# Altium PCB MONO65_A2.PcbDoc (part 1 of 4)
Units mm, origin at the board's own origin, x right, y up, seen from the top; angles counter-clockwise.
Board outline 304.6 x 95.05 mm, 2 copper layers (Component Side, Solder Side), stack 1.586 mm thick; 275 components, 185 nets, 1029 pads, 156 vias.
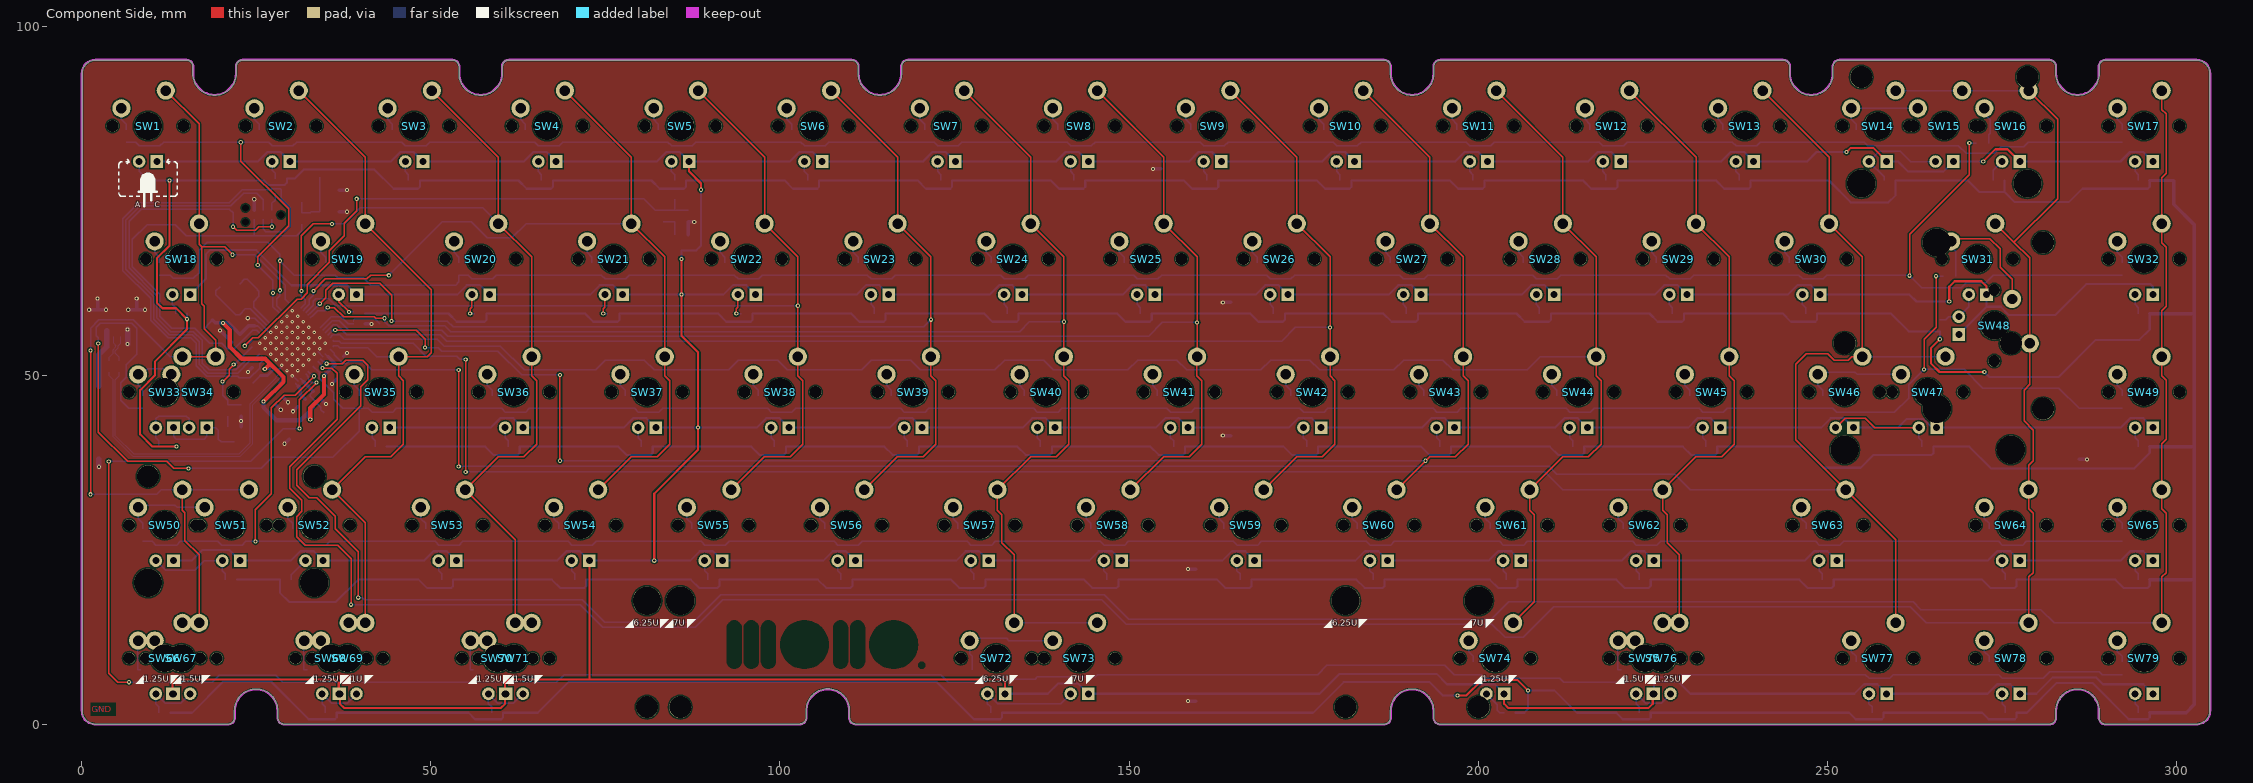
[diagram p0: Component Side view]
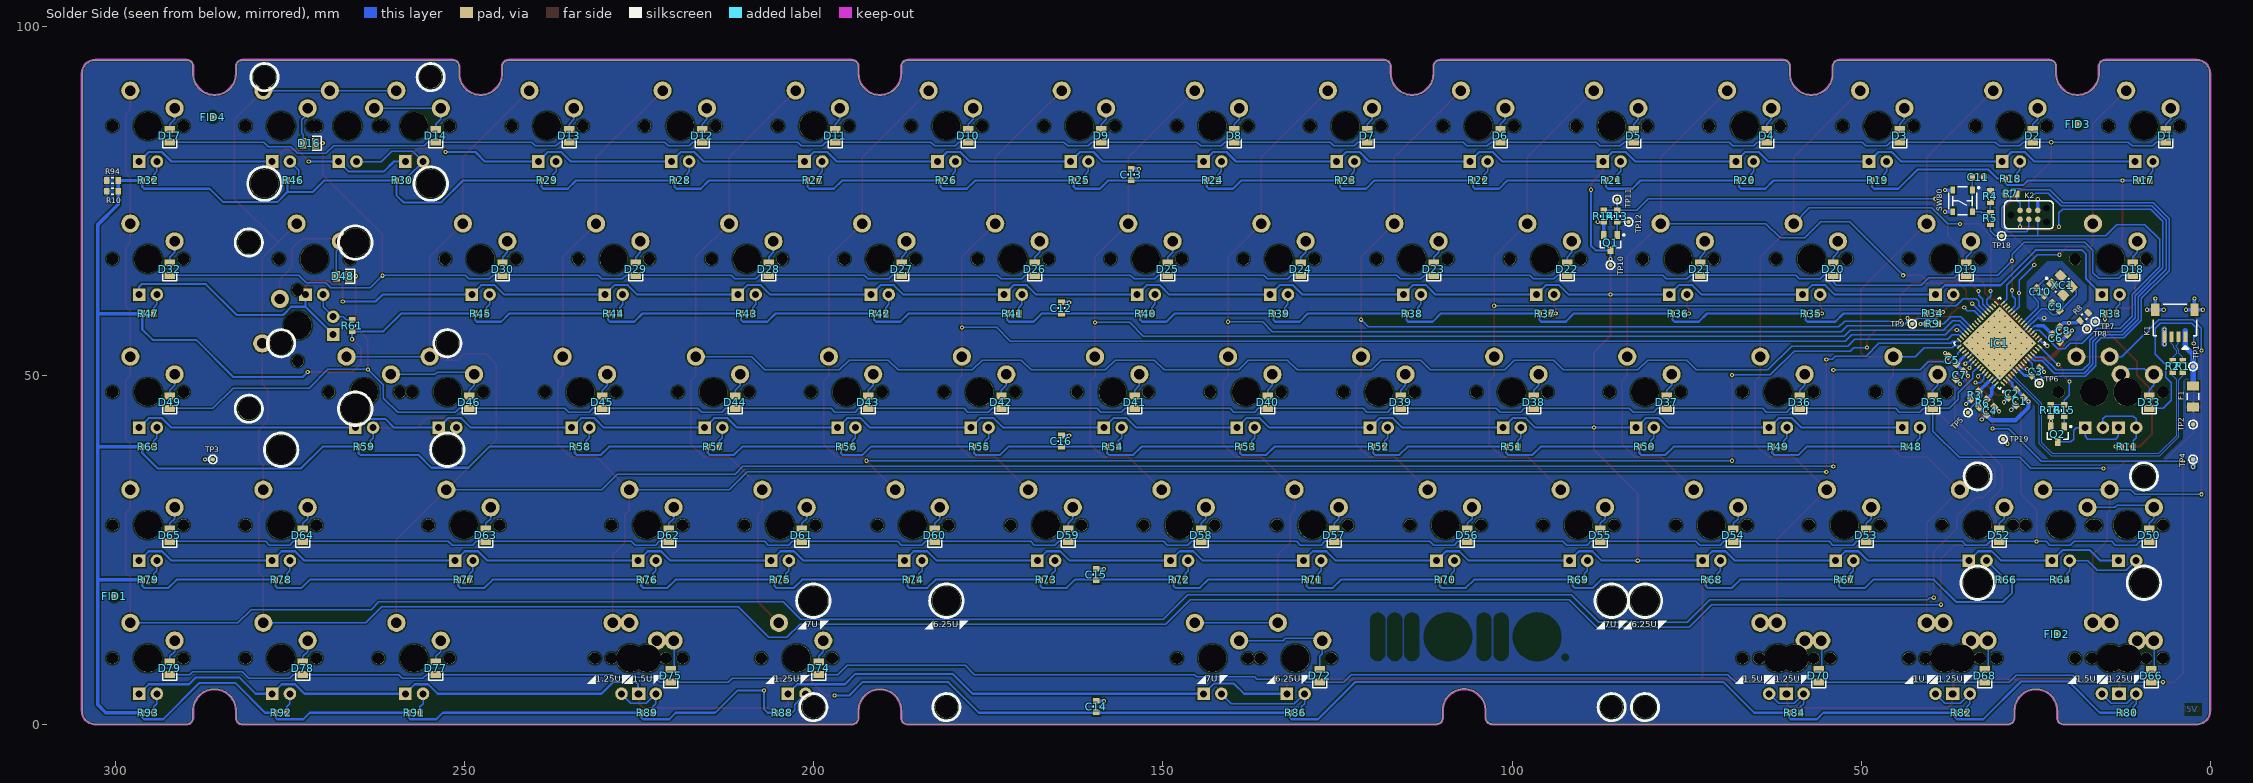
[diagram p1: Solder Side view, seen from below]
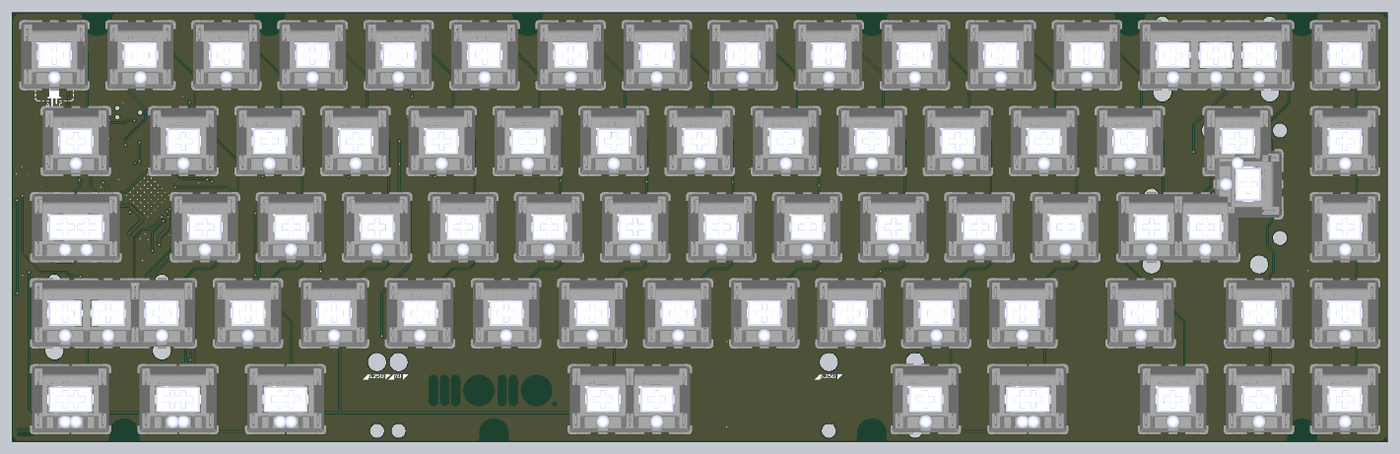
[diagram p4: 3D render of the assembled board from above, using the file's embedded part models]
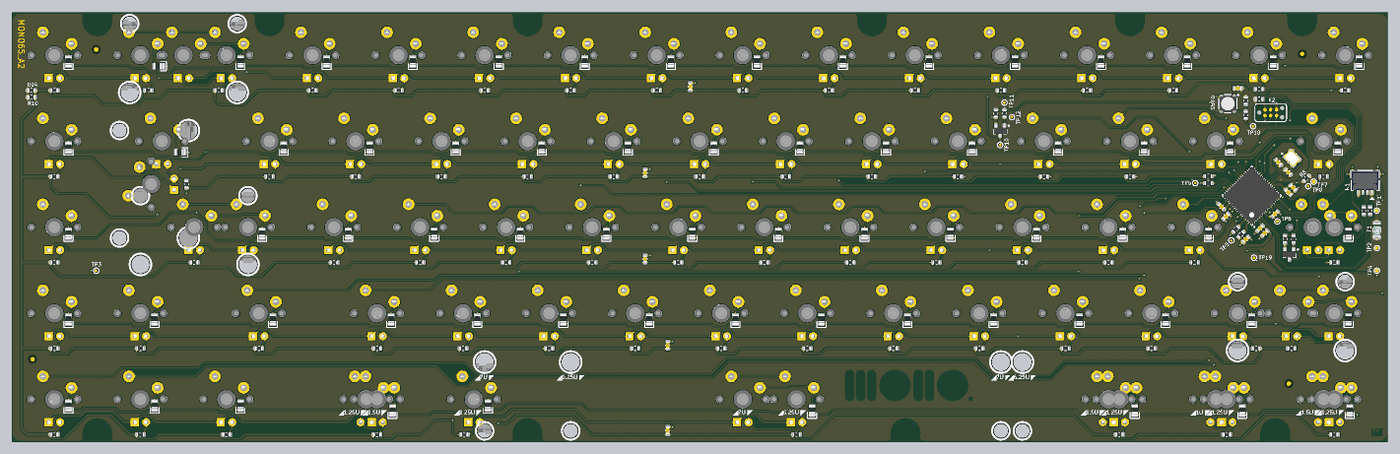
[diagram p5: 3D render of the assembled board from below, using the file's embedded part models]

## Layer stack, top to bottom
Top Solder: solder mask 0.0102, Solder Resist, Dk 3.5
Component Side: signal copper 0.018
Dielectric 1: core 1.55, Core-009, Dk 4.5
Solder Side: signal copper 0.018
Bottom Solder: solder mask 0.0102, Solder Resist, Dk 3.5

## Board outline
2,0.1 21.003,0.1 ccw(c21.003,1) 21.903,1 21.903,2.025 cw(c22.003,2.025) 21.903,2.026 cw(c25.003,2.025) 28.103,2.025 28.103,1 ccw(c29.003,1) 29.003,0.1 94.565,0.115 cw(c94.565,0.015) 94.565,0.115 102.851,0.115 cw(c102.851,0.015) 102.852,0.115 ccw(c102.851,1.015) 103.751,1.015 103.751,2.04 cw(c103.851,2.04) 103.751,2.041 cw(c106.851,2.04) 109.951,2.04 109.951,1.016 cw(c110.877,1.026) 109.951,1.016 ccw(c110.877,1.026) 110.852,0.1 ccw(c110.877,1.026) 110.854,0.1 110.851,0.1 186.5,0.1 ccw(c186.5,1) 187.4,1 187.4,2.025 cw(c187.5,2.025) 187.4,2.026 ccw(c190.5,2.025) 187.4,2.025 187.4,2.026 cw(c190.5,2.025) 193.6,2.025 193.6,1 ccw(c194.5,1) 194.5,0.1 281.75,0.101 cw(c281.75,0.001) 281.751,0.101 ccw(c281.751,1) 282.65,1 ccw(c281.751,1) 282.65,1 ccw(c281.751,1) 282.65,1.001 cw(c282.75,1.001) 282.65,1.001 282.65,2.026 cw(c282.75,2.026) 282.65,2.027 ccw(c285.75,2.025) 282.65,2.026 282.65,2.027 cw(c285.75,2.025) 288.85,2.026 cw(c288.75,2.026) 288.85,2.026 288.85,1.001 cw(c288.75,1.001) 288.85,1 cw(c289.749,1) 288.85,1.001 ccw(c288.75,1.001) 288.85,1.001 288.85,1 ccw(c289.749,1) 289.749,0.101 cw(c289.75,0.001) 289.75,0.101 292.125,0.1 302.8,0.1 ccw(c302.799,2.001) 304.7,2 304.7,93.25 ccw(c302.799,93.249) 302.8,95.15 292.125,95.149 cw(c292.125,95.249) 292.125,95.149 289.75,95.149 cw(c289.75,95.249) 289.75,95.149 ccw(c289.749,94.25) 288.85,94.25 ccw(c289.749,94.25) 288.85,94.249 288.85,93.224 cw(c288.75,93.224) 288.85,93.224 cw(c285.75,93.225) 282.65,93.223 cw(c282.75,93.224) 282.65,93.224 282.65,94.249 cw(c282.75,94.249) 282.65,94.25 ccw(c281.75,94.25) 281.751,95.15 cw(c281.75,95.25) 281.75,95.15 251.65,95.149 ccw(c251.65,95.249) 251.65,95.149 cw(c251.65,95.249) 251.65,95.149 ccw(c251.649,94.25) 250.75,94.25 ccw(c251.649,94.25) 250.75,94.249 ccw(c250.65,94.249) 250.75,94.25 250.75,94.249 250.75,93.224 cw(c250.65,93.224) 250.75,93.223 ccw(c247.65,93.225) 250.75,93.224 ccw(c250.65,93.224) 250.75,93.224 250.75,93.223 cw(c247.65,93.225) 244.55,93.224 cw(c244.65,93.224) 244.55,93.224 244.55,94.249 cw(c244.65,94.249) 244.55,94.249 ccw(c243.65,94.25) 244.55,94.25 ccw(c243.65,94.25) 243.65,95.15 cw(c243.649,95.25) 243.649,95.15 194.5,95.149 cw(c194.5,95.249) 194.5,95.149 ccw(c194.499,94.25) 193.6,94.25 cw(c193.5,94.249) 193.6,94.249 193.6,93.224 cw(c193.5,93.224) 193.6,93.224 cw(c190.5,93.225) 187.4,93.223 cw(c187.5,93.224) 187.4,93.224 187.4,94.249 cw(c187.5,94.249) 187.4,94.25 ccw(c186.5,94.25) 186.501,95.15 cw(c186.5,95.25) 186.5,95.15 118.3,95.149 cw(c118.3,95.249) 118.3,95.149 ccw(c118.299,94.25) 117.4,94.25 ccw(c118.299,94.25) 117.4,94.249 ccw(c117.3,94.249) 117.4,94.25 117.4,94.249 117.4,93.224 cw(c117.3,93.224) 117.4,93.224 cw(c114.3,93.225) 111.2,93.223 cw(c114.3,93.225) 111.2,93.224 cw(c111.3,93.224) 111.2,93.224 111.2,94.249 cw(c111.3,94.249) 111.2,94.25 ccw(c110.3,94.25) 110.3,95.15 cw(c110.299,95.25) 110.299,95.15 88.25,95.149 cw(c88.25,95.249) 88.25,95.149 61.15,95.149 cw(c61.15,95.249) 61.15,95.149 ccw(c61.149,94.25) 60.25,94.25 cw(c60.15,94.249) 60.25,94.249 60.25,93.224 cw(c60.15,93.224) 60.25,93.223 cw(c57.15,93.225) 54.05,93.224 cw(c54.15,93.224) 54.05,93.224 54.05,94.249 cw(c54.15,94.249) 54.05,94.249 ccw(c53.15,94.25) 54.05,94.25 ccw(c53.15,94.25) 53.15,95.15 23.05,95.149 cw(c23.05,95.249) 23.05,95.149 ccw(c23.049,94.25) 22.15,94.25 cw(c22.05,94.249) 22.15,94.249 22.15,93.224 cw(c22.05,93.224) 22.15,93.223 ccw(c19.05,93.225) 22.15,93.224 ccw(c22.05,93.224) 22.15,93.224 22.15,93.223 cw(c19.05,93.225) 15.95,93.224 cw(c16.05,93.224) 15.95,93.224 15.95,94.249 cw(c16.05,94.249) 15.95,94.25 ccw(c15.051,94.25) 15.95,94.25 ccw(c15.051,94.25) 15.05,95.149 cw(c15.05,95.249) 15.05,95.149 12.675,95.15 2,95.15 ccw(c2.001,93.249) 0.1,93.251 cw(c0,93.25) 0.1,93.25 0.1,2 cw(c0,2) 0.1,1.999 ccw(c2.001,2.001)

## Design rules (kind name [scope] priority, off if disabled: settings)
Clearance Clearance_FIDs [(InComponent('FID1') OR InComponent('FID2') OR InComponent('FID3') OR InComponent('FID4')) vs (InPolygon AND OnLayer('Component Side') OR OnLayer('Solder Side'))] p1: gap=0.5 ignorepadtopadclearanceinfootprint=FALSE
Clearance Clearance_USB-5V_SYS [InNetClass('USB') vs InNamedPolygon('5V_SYS_L02_P008')] p2: gap=0.5 ignorepadtopadclearanceinfootprint=TRUE
Clearance [All] p3: gap=0.2 ignorepadtopadclearanceinfootprint=TRUE
ComponentClearance [All] p1 off: gap=0.254 collisioncheckmode=3 verticalgap=0.254 showdistances=FALSE
DiffPairsRouting DiffPair_90_USB_DiffPairsRouting [InDifferentialPairClass('DIFF_90Ohm_USB')] p1: maxlimit=0.2 minlimit=0.2 mostfreqgap=0.2 toplayer_minwidth=0.135 toplayer_maxwidth=0.135 toplayer_prefwidth=0.135 bottomlayer_minwidth=0.135 bottomlayer_maxwidth=0.135 bottomlayer_prefwidth=0.135 maxuncoupledlength=12.7
DiffPairsRouting [All] p2: maxlimit=0.254 minlimit=0.254 mostfreqgap=0.254 toplayer_minwidth=0.381 toplayer_maxwidth=0.381 toplayer_prefwidth=0.381 bottomlayer_minwidth=0.381 bottomlayer_maxwidth=0.381 bottomlayer_prefwidth=0.381 maxuncoupledlength=12.7
Height [All] p1 off: minheight=0 maxheight=25.4 prefheight=12.7
HoleSize [All] p1: absolutevalues=TRUE maxlimit=5 minlimit=0.15 maxpercent=80.000 minpercent=20.000
MatchedLengths DiffPair_100_HDMI_MatchedLengths [InDifferentialPairClass('DIFF_100Ohm_HDMI')] p1: tolerance=0.15 checknetsindiffpair=TRUE checkdiffpairvsdiffpair=FALSE checkxsignals=FALSE checkothers=FALSE
MatchedLengths DiffPair_100_ETH_MatchedLengths [InDifferentialPairClass('DIFF_100Ohm_ETHERNET')] p2: tolerance=0.15 checknetsindiffpair=TRUE checkdiffpairvsdiffpair=FALSE checkxsignals=FALSE checkothers=FALSE
MatchedLengths DiffPair_100_DSI_MatchedLengths [InDifferentialPairClass('DIFF_100Ohm_DSI')] p3: tolerance=0.15 checknetsindiffpair=TRUE checkdiffpairvsdiffpair=FALSE checkxsignals=FALSE checkothers=FALSE
MatchedLengths DiffPair_90_USB_MatchedLengths [InDifferentialPairClass('DIFF_90Ohm_USB')] p4: tolerance=0.15 checknetsindiffpair=TRUE checkdiffpairvsdiffpair=FALSE checkxsignals=FALSE checkothers=FALSE
MinimumSolderMaskSliver [All] p1: minsoldermaskwidth=0.127
PlaneClearance [All] p1: clearance=0.5
PlaneConnect PlaneConnect_Via [IsVia] p1: planeconnectstyle=Direct reliefexpansion=0.508 reliefentries=4 reliefconductorwidth=0.254 reliefairgap=0.254
PlaneConnect [All] p2: pad.planeconnectstyle=Relief pad.reliefexpansion=0.5 pad.reliefentries=4 pad.reliefconductorwidth=0.75 pad.reliefairgap=0.15 via.planeconnectstyle=Direct via.reliefexpansion=0.5 via.reliefentries=4 via.reliefconductorwidth=0.75 via.reliefairgap=0.25
PolygonConnect PolygonConnect_Any_net_TOP_LAYER [InNetClass('All Nets') vs OnLayer('Component Side')] p1: thpad.connectstyle=Relief thpad.reliefconductorwidth=1 thpad.reliefentries=4 thpad.polygonreliefangle="90 Angle" thpad.airgapwidth=0.15 smdpad.connectstyle=Relief smdpad.reliefconductorwidth=0.5 smdpad.reliefentries=4 smdpad.polygonreliefangle="90 Angle" smdpad.airgapwidth=0.15 via.connectstyle=Direct via.reliefconductorwidth=1 via.reliefentries=4 via.polygonreliefangle="90 Angle" via.airgapwidth=0.15
PolygonConnect PolygonConnect_Any_net_All_layers [InNetClass('All Nets')] p2: thpad.connectstyle=Relief thpad.reliefconductorwidth=1 thpad.reliefentries=4 thpad.polygonreliefangle="90 Angle" thpad.airgapwidth=0.15 smdpad.connectstyle=Relief smdpad.reliefconductorwidth=0.5 smdpad.reliefentries=4 smdpad.polygonreliefangle="90 Angle" smdpad.airgapwidth=0.15 via.connectstyle=Direct via.reliefconductorwidth=1 via.reliefentries=4 via.polygonreliefangle="90 Angle" via.airgapwidth=0.15
PolygonConnect PolygonConnect_GND [InNet('GND')] p3: thpad.connectstyle=Relief thpad.reliefconductorwidth=1 thpad.reliefentries=4 thpad.polygonreliefangle="90 Angle" thpad.airgapwidth=0.15 smdpad.connectstyle=Relief smdpad.reliefconductorwidth=1 smdpad.reliefentries=4 smdpad.polygonreliefangle="90 Angle" smdpad.airgapwidth=0.15 via.connectstyle=Direct via.reliefconductorwidth=1 via.reliefentries=4 via.polygonreliefangle="90 Angle" via.airgapwidth=0.15
RoutingVias [All] p1: holewidth=0.3 width=0.6 viastyle="Through Hole" minholewidth=0.2 minwidth=0.5 maxholewidth=0.3 maxwidth=0.6
SolderMaskExpansion [All] p1: expansion=0.102
UnRoutedNet [All] p1: checkbadconnections=TRUE
Width [All] p1: maxlimit=20 minlimit=0.15 preferedwidth=0.5
22 further rules are at their usual default settings.

## Classes and differential pairs
component class "MONO65_A2_s06 [LEDs]": C12 C13 C14 C15 C16 Q1 Q2 R10 R11 R13 R14 R15 R16 R17 R18 R19 R20 R21 R22 R23 R24 R25 R26 R27 R28 R29 R30 R32 R33 R34 R35 R36 R37 R38 R39 R40 R41 R42 R43 R44 R45 R46 R47 R48 R49 R50 R51 R52 R53 R54 R55 R56 R57 R58 R59 R61 R63 R64 R66 R67 R68 R69 R70 R71 R72 R73 R74 R75 R76 R77 R78 R79 R80 R82 R84 R86 R88 R89 R91 R92 R93 R94 TP10 TP11 TP12
differential pair class DIFF_90Ohm_USB: MCU_USB USB
net class USB: MCU_USB_N MCU_USB_P USB_N USB_P
component class "MONO65_A2_s07 [PSU]": F1 FID1 FID2 FID3 FID4 K1 R1 R2 TP1 TP2 TP3 TP4
component class "MONO65_A2_s03 [MCU]": C1 C2 C3 C4 C5 C6 C7 C8 C9 C10 C11 IC1 K2 R3 R4 R5 R6 R7 R8 R9 SW80 TP5 TP6 TP7 TP8 TP9 TP18 TP19 XC1
component class "MONO65_A2_s04 [Switches-1]": D1 D2 D3 D4 D5 D6 D7 D8 D9 D10 D11 D12 D13 D14 D16 D17 D18 D19 D20 D21 D22 D23 D24 D25 D26 D27 D28 D29 D30 D32 D33 D35 D36 D37 D38 D39 D40 D41 D42 D43 D44 D45 D46 D48 D49 D50 D52 D53 D54 D55 D56 D57 D58 D59 D60 D61 D62 D63 D64 D65 D66 D68 D70 D72 D74 D75 D77 D78 D79 SW1 SW2 SW3 SW4 SW5 SW6 SW7 SW8 SW9 SW10 SW11 SW12 SW13 SW14 SW15 SW16 SW17 SW18 SW19 SW20 SW21 SW22 SW23 SW24 SW25 SW26 SW27 SW28 SW29 SW30 SW31 SW32 SW33 SW34 SW35 SW36 SW37 SW38 SW39 SW40 SW41 SW42 SW43 SW44 SW45 SW46 SW47 SW48 SW49 SW50 SW51 SW52 SW53 SW54 SW55 SW56 SW57 SW58 SW59 SW60 SW61 SW62 SW63 SW64 SW65 SW66 SW67 SW68 SW69 SW70 SW71 SW72 SW73 SW74 SW75 SW76 SW77 SW78 SW79
differential pair USB: +USB_P -USB_N
differential pair MCU_USB: +MCU_USB_P -MCU_USB_N

## Components (designator, comment, footprint, x,y, rotation, side; value= is the part's Value field where it differs from the comment)
C1 "10u 16V" CAPC1608X08N 27.3,46.325 r315 bottom
C2 "100n 50V" CAPC1608X08N 28.35,47.4 r315 bottom
C3 "1u 25V" CAPC1608X08N 25.05,50.575 r135 bottom
C4 "100n 50V" CAPC1608X08N 31.525,44.95 r135 bottom
C5 "100n 50V" CAPC1608X08N 36.95,52.2 r45 bottom
C6 "100n 50V" CAPC1608X08N 22.125,55.344 r225 bottom
C7 "10u 16V" CAPC1608X08N 35.925,50.025 r315 bottom
C8 "10u 16V" CAPC1608X08N 21.05,56.4 r225 bottom
C9 "22p 50V" CAPC1608X08N 22.145,59.818 r45 bottom
C10 "22p 50V" CAPC1608X08N 24.34,62.018 r225 bottom
C11 "100n 50V" CAPC1608X08N 33.285,78.4 r0 bottom
C12 "10u 16V" CAPC1608X08N 164.5,59.666 r90 bottom
C13 "10u 16V" CAPC1608X08N 154.5,78.781 r90 bottom
C14 "10u 16V" CAPC1608X08N 159.5,2.6 r90 bottom
C15 "10u 16V" CAPC1608X08N 159.5,21.5 r90 bottom
C16 "10u 16V" CAPC1608X08N 164.5,40.6 r90 bottom
D1 "SD0805S040S0R5" "DIOC2012X06N - signal" 6.4,84.3 r90 bottom
D2 "SD0805S040S0R5" "DIOC2012X06N - signal" 25.45,84.3 r90 bottom
D3 "SD0805S040S0R5" "DIOC2012X06N - signal" 44.5,84.3 r90 bottom
D4 "SD0805S040S0R5" "DIOC2012X06N - signal" 63.55,84.3 r90 bottom
D5 "SD0805S040S0R5" "DIOC2012X06N - signal" 82.6,84.3 r90 bottom
D6 "SD0805S040S0R5" "DIOC2012X06N - signal" 101.65,84.3 r90 bottom
D7 "SD0805S040S0R5" "DIOC2012X06N - signal" 120.7,84.3 r90 bottom
D8 "SD0805S040S0R5" "DIOC2012X06N - signal" 139.75,84.3 r90 bottom
D9 "SD0805S040S0R5" "DIOC2012X06N - signal" 158.8,84.3 r90 bottom
D10 "SD0805S040S0R5" "DIOC2012X06N - signal" 177.85,84.3 r90 bottom
D11 "SD0805S040S0R5" "DIOC2012X06N - signal" 196.9,84.3 r90 bottom
D12 "SD0805S040S0R5" "DIOC2012X06N - signal" 215.95,84.3 r90 bottom
D13 "SD0805S040S0R5" "DIOC2012X06N - signal" 235,84.3 r90 bottom
D14 "SD0805S040S0R5" "DIOC2012X06N - signal" 254.05,84.3 r90 bottom
D16 "SD0805S040S0R5" "DIOC2012X06N - signal" 272.173,83.275 r0 bottom
D17 "SD0805S040S0R5" "DIOC2012X06N - signal" 292.15,84.3 r90 bottom
D18 "SD0805S040S0R5" "DIOC2012X06N - signal" 11.162,65.25 r90 bottom
D19 "SD0805S040S0R5" "DIOC2012X06N - signal" 34.975,65.25 r90 bottom
D20 "SD0805S040S0R5" "DIOC2012X06N - signal" 54.025,65.25 r90 bottom
D21 "SD0805S040S0R5" "DIOC2012X06N - signal" 73.075,65.25 r90 bottom
D22 "SD0805S040S0R5" "DIOC2012X06N - signal" 92.125,65.25 r90 bottom
D23 "SD0805S040S0R5" "DIOC2012X06N - signal" 111.175,65.25 r90 bottom
D24 "SD0805S040S0R5" "DIOC2012X06N - signal" 130.225,65.25 r90 bottom
D25 "SD0805S040S0R5" "DIOC2012X06N - signal" 149.275,65.25 r90 bottom
D26 "SD0805S040S0R5" "DIOC2012X06N - signal" 168.325,65.25 r90 bottom
D27 "SD0805S040S0R5" "DIOC2012X06N - signal" 187.375,65.25 r90 bottom
D28 "SD0805S040S0R5" "DIOC2012X06N - signal" 206.425,65.25 r90 bottom
D29 "SD0805S040S0R5" "DIOC2012X06N - signal" 225.475,65.25 r90 bottom
D30 "SD0805S040S0R5" "DIOC2012X06N - signal" 244.525,65.25 r90 bottom
D32 "SD0805S040S0R5" "DIOC2012X06N - signal" 292.15,65.25 r90 bottom
D33 "SD0805S040S0R5" "DIOC2012X06N - signal" 8.782,46.2 r90 bottom
D35 "SD0805S040S0R5" "DIOC2012X06N - signal" 39.738,46.2 r90 bottom
D36 "SD0805S040S0R5" "DIOC2012X06N - signal" 58.788,46.2 r90 bottom
D37 "SD0805S040S0R5" "DIOC2012X06N - signal" 77.838,46.2 r90 bottom
D38 "SD0805S040S0R5" "DIOC2012X06N - signal" 96.888,46.2 r90 bottom
D39 "SD0805S040S0R5" "DIOC2012X06N - signal" 115.938,46.2 r90 bottom
D40 "SD0805S040S0R5" "DIOC2012X06N - signal" 134.988,46.2 r90 bottom
D41 "SD0805S040S0R5" "DIOC2012X06N - signal" 154.038,46.2 r90 bottom
D42 "SD0805S040S0R5" "DIOC2012X06N - signal" 173.088,46.2 r90 bottom
D43 "SD0805S040S0R5" "DIOC2012X06N - signal" 192.138,46.2 r90 bottom
D44 "SD0805S040S0R5" "DIOC2012X06N - signal" 211.188,46.2 r90 bottom
D45 "SD0805S040S0R5" "DIOC2012X06N - signal" 230.238,46.2 r90 bottom
D46 "SD0805S040S0R5" "DIOC2012X06N - signal" 249.288,46.2 r90 bottom
D48 "SD0805S040S0R5" "DIOC2012X06N - signal" 267.411,64.225 r0 bottom
D49 "SD0805S040S0R5" "DIOC2012X06N - signal" 292.15,46.2 r90 bottom
D50 "SD0805S040S0R5" "DIOC2012X06N - signal" 8.782,27.15 r90 bottom
D52 "SD0805S040S0R5" "DIOC2012X06N - signal" 30.213,27.15 r90 bottom
D53 "SD0805S040S0R5" "DIOC2012X06N - signal" 49.263,27.15 r90 bottom
D54 "SD0805S040S0R5" "DIOC2012X06N - signal" 68.313,27.15 r90 bottom
D55 "SD0805S040S0R5" "DIOC2012X06N - signal" 87.363,27.15 r90 bottom
D56 "SD0805S040S0R5" "DIOC2012X06N - signal" 106.413,27.15 r90 bottom
D57 "SD0805S040S0R5" "DIOC2012X06N - signal" 125.463,27.15 r90 bottom
D58 "SD0805S040S0R5" "DIOC2012X06N - signal" 144.513,27.15 r90 bottom
D59 "SD0805S040S0R5" "DIOC2012X06N - signal" 163.563,27.15 r90 bottom
D60 "SD0805S040S0R5" "DIOC2012X06N - signal" 182.613,27.15 r90 bottom
D61 "SD0805S040S0R5" "DIOC2012X06N - signal" 201.663,27.15 r90 bottom
D62 "SD0805S040S0R5" "DIOC2012X06N - signal" 220.713,27.15 r90 bottom
D63 "SD0805S040S0R5" "DIOC2012X06N - signal" 246.907,27.15 r90 bottom
D64 "SD0805S040S0R5" "DIOC2012X06N - signal" 273.101,27.15 r90 bottom
D65 "SD0805S040S0R5" "DIOC2012X06N - signal" 292.15,27.15 r90 bottom
D66 "SD0805S040S0R5" "DIOC2012X06N - signal" 8.482,7 r90 bottom
D68 "SD0805S040S0R5" "DIOC2012X06N - signal" 32.294,7 r90 bottom
D70 "SD0805S040S0R5" "DIOC2012X06N - signal" 56.106,7 r90 bottom
D72 "SD0805S040S0R5" "DIOC2012X06N - signal" 127.544,7 r90 bottom
D74 "SD0805S040S0R5" "DIOC2012X06N - signal" 199.282,8.1 r90 bottom
D75 "SD0805S040S0R5" "DIOC2012X06N - signal" 220.413,7 r90 bottom
D77 "SD0805S040S0R5" "DIOC2012X06N - signal" 254.051,8.1 r90 bottom
D78 "SD0805S040S0R5" "DIOC2012X06N - signal" 273.1,8.1 r90 bottom
D79 "SD0805S040S0R5" "DIOC2012X06N - signal" 292.15,8.1 r90 bottom
Designator8 "Comment" "TITLE BLOCK A3" -43.299,-105.328 r0 top locked
F1 "0.5A 15VDC PTC" PTC3116X06N 2.5,47 r270 bottom
FID1 "FIDUCIAL 1MM" "FID 1mm" 300.1,18.4 r90 bottom
FID2 "FIDUCIAL 1MM" "FID 1mm" 22,13 r90 bottom
FID3 "FIDUCIAL 1MM" "FID 1mm" 19,86 r90 bottom
FID4 "FIDUCIAL 1MM" "FID 1mm" 286,87 r90 bottom
IC1 "AT90USB1286-MU" QFN50P900X900X100_HS-65N 30.2,54.61 r45 bottom
K1 "SM04B-SRSS-TB" SM04B-SRSS-TB 5.1,58 r0 bottom locked
K2 "TC2030-ICESPI-NL" TC2030-6pin-NL 26,73 r180 bottom
Q1 "FDV303N" SOT95P235X110-3N 85.9,69.025 r270 bottom
Q2 "FDV303N" SOT95P235X110-3N 21.9,41.6 r270 bottom
R1 "22R 1%" RESC1608X04N 4,51.3 r270 bottom
R2 "22R 1%" RESC1608X04N 5.4,51.3 r270 bottom
R3 "0R 1%" RESC1608X04N 33.758,47.163 r315 bottom
R4 "10k 1%" RESC1608X04N 31.5,75.645 r270 bottom
R5 "0R 1%" RESC1608X04N 31.5,72.5 r270 bottom
R6 "0R 1%" RESC1608X04N 32.6,46.025 r315 bottom
R7 "0R 1%" RESC1608X04N 28.575,76 r180 bottom
R8 "0R 1%" RESC1608X04N 18.087,58.42 r315 bottom
R9 "10k 1%" RESC1608X04N 39.8,57.4 r180 bottom
R10 "0R 1%" RESC1608X04N 300.355,76.4 r180 bottom
R11 "470R 1%" RESC1608X04N 11.907,39.825 r180 bottom
R13 "470R 1%" RESC1608X04N 84.95,72.825 r270 bottom
R14 "10k 1%" RESC1608X04N 86.85,72.825 r270 bottom
R15 "470R 1%" RESC1608X04N 20.95,45 r270 bottom
R16 "10k 1%" RESC1608X04N 22.85,45 r270 bottom
R17 "470R 1%" RESC1608X04N 9.525,77.925 r180 bottom
R18 "470R 1%" RESC1608X04N 28.575,78.2 r180 bottom
R19 "470R 1%" RESC1608X04N 47.625,77.925 r180 bottom
R20 "470R 1%" RESC1608X04N 66.675,77.925 r180 bottom
R21 "470R 1%" RESC1608X04N 85.725,77.925 r180 bottom
R22 "470R 1%" RESC1608X04N 104.775,77.925 r180 bottom
R23 "470R 1%" RESC1608X04N 123.825,77.925 r180 bottom
R24 "470R 1%" RESC1608X04N 142.875,77.925 r180 bottom
R25 "470R 1%" RESC1608X04N 161.925,77.925 r180 bottom
R26 "470R 1%" RESC1608X04N 180.975,77.925 r180 bottom
R27 "470R 1%" RESC1608X04N 200.025,77.925 r180 bottom
R28 "470R 1%" RESC1608X04N 219.075,77.925 r180 bottom
R29 "470R 1%" RESC1608X04N 238.125,77.925 r180 bottom
R30 "470R 1%" RESC1608X04N 258.9,77.925 r180 bottom
R32 "470R 1%" RESC1608X04N 295.275,77.925 r180 bottom
R33 "470R 1%" RESC1608X04N 14.287,58.875 r180 bottom
R34 "470R 1%" RESC1608X04N 39.8,58.9 r180 bottom
R35 "470R 1%" RESC1608X04N 57.15,58.875 r180 bottom
R36 "470R 1%" RESC1608X04N 76.2,58.875 r180 bottom
R37 "470R 1%" RESC1608X04N 95.25,58.875 r180 bottom
R38 "470R 1%" RESC1608X04N 114.3,58.875 r180 bottom
R39 "470R 1%" RESC1608X04N 133.35,58.875 r180 bottom
R40 "470R 1%" RESC1608X04N 152.4,58.875 r180 bottom
R41 "470R 1%" RESC1608X04N 171.45,58.875 r180 bottom
R42 "470R 1%" RESC1608X04N 190.5,58.875 r180 bottom
R43 "470R 1%" RESC1608X04N 209.55,58.875 r180 bottom
R44 "470R 1%" RESC1608X04N 228.6,58.875 r180 bottom
R45 "470R 1%" RESC1608X04N 247.65,58.875 r180 bottom
R46 "470R 1%" RESC1608X04N 274.5,77.925 r180 bottom
R47 "470R 1%" RESC1608X04N 295.275,58.875 r180 bottom
R48 "470R 1%" RESC1608X04N 42.863,39.825 r180 bottom
R49 "470R 1%" RESC1608X04N 61.913,39.825 r180 bottom
R50 "470R 1%" RESC1608X04N 80.963,39.825 r180 bottom
R51 "470R 1%" RESC1608X04N 100.013,39.825 r180 bottom
R52 "470R 1%" RESC1608X04N 119.063,39.825 r180 bottom
R53 "470R 1%" RESC1608X04N 138.113,39.825 r180 bottom
R54 "470R 1%" RESC1608X04N 157.163,39.825 r180 bottom
R55 "470R 1%" RESC1608X04N 176.213,39.825 r180 bottom
R56 "470R 1%" RESC1608X04N 195.263,39.825 r180 bottom
R57 "470R 1%" RESC1608X04N 214.313,39.825 r180 bottom
R58 "470R 1%" RESC1608X04N 233.363,39.825 r180 bottom
R59 "470R 1%" RESC1608X04N 264.319,39.825 r180 bottom
R61 "470R 1%" RESC1608X04N 266.044,57.15 r90 bottom
R63 "470R 1%" RESC1608X04N 295.275,39.825 r180 bottom
R64 "470R 1%" RESC1608X04N 21.432,20.775 r180 bottom
R66 "470R 1%" RESC1608X04N 29.232,20.775 r0 bottom
R67 "470R 1%" RESC1608X04N 52.388,20.775 r180 bottom
R68 "470R 1%" RESC1608X04N 71.438,20.775 r180 bottom
R69 "470R 1%" RESC1608X04N 90.488,20.775 r180 bottom
R70 "470R 1%" RESC1608X04N 109.538,20.775 r180 bottom
R71 "470R 1%" RESC1608X04N 128.588,20.775 r180 bottom
R72 "470R 1%" RESC1608X04N 147.638,20.775 r180 bottom
R73 "470R 1%" RESC1608X04N 166.688,20.775 r180 bottom
R74 "470R 1%" RESC1608X04N 185.738,20.775 r180 bottom
R75 "470R 1%" RESC1608X04N 204.788,20.775 r180 bottom
R76 "470R 1%" RESC1608X04N 223.838,20.775 r180 bottom
R77 "470R 1%" RESC1608X04N 250.032,20.775 r180 bottom
R78 "470R 1%" RESC1608X04N 276.226,20.775 r180 bottom
R79 "470R 1%" RESC1608X04N 295.275,20.775 r180 bottom
R80 "470R 1%" RESC1608X04N 11.907,1.725 r180 bottom
R82 "470R 1%" RESC1608X04N 35.719,1.725 r180 bottom
R84 "470R 1%" RESC1608X04N 59.531,1.725 r180 bottom
R86 "470R 1%" RESC1608X04N 130.969,1.725 r180 bottom
R88 "470R 1%" RESC1608X04N 204.5,1.725 r180 bottom
R89 "470R 1%" RESC1608X04N 223.838,1.725 r180 bottom
R91 "470R 1%" RESC1608X04N 257.175,1.725 r180 bottom
R92 "470R 1%" RESC1608X04N 276.225,1.725 r180 bottom
R93 "470R 1%" RESC1608X04N 295.275,1.725 r180 bottom
R94 "0R 1%" RESC1608X04N 300.355,77.925 r180 bottom
SW1 "MX1A-11GW" MX1A-1-LED-Pins 9.525,85.725 r0 top locked
SW2 "MX1A-11GW" MX1A-1-LED-Pins 28.575,85.725 r0 top locked
SW3 "MX1A-11GW" MX1A-1-LED-Pins 47.625,85.725 r0 top locked
SW4 "MX1A-11GW" MX1A-1-LED-Pins 66.675,85.725 r0 top locked
SW5 "MX1A-11GW" MX1A-1-LED-Pins 85.725,85.725 r0 top locked
SW6 "MX1A-11GW" MX1A-1-LED-Pins 104.775,85.725 r0 top locked
SW7 "MX1A-11GW" MX1A-1-LED-Pins 123.825,85.725 r0 top locked
SW8 "MX1A-11GW" MX1A-1-LED-Pins 142.875,85.725 r0 top locked
SW9 "MX1A-11GW" MX1A-1-LED-Pins 161.925,85.725 r0 top locked
SW10 "MX1A-11GW" MX1A-1-LED-Pins 180.975,85.725 r0 top locked
SW11 "MX1A-11GW" MX1A-1-LED-Pins 200.025,85.725 r0 top locked
SW12 "MX1A-11GW" MX1A-1-LED-Pins 219.075,85.725 r0 top locked
SW13 "MX1A-11GW" MX1A-1-LED-Pins 238.125,85.725 r0 top locked
SW14 "MX1A-11GW" MX1A-1-LED-Pins 257.175,85.725 r0 top locked
SW15 "MX1A-11GW" MX1A-1-LED-Pins 266.7,85.725 r0 top locked
SW16 "MX1A-11GW" MX1A-1-LED-Pins 276.225,85.725 r0 top locked
SW17 "MX1A-11GW" MX1A-1-LED-Pins 295.275,85.725 r0 top
SW18 "MX1A-11GW" MX1A-1-LED-Pins 14.287,66.675 r0 top locked
SW19 "MX1A-11GW" MX1A-1-LED-Pins 38.1,66.675 r0 top locked
SW20 "MX1A-11GW" MX1A-1-LED-Pins 57.15,66.675 r0 top locked
SW21 "MX1A-11GW" MX1A-1-LED-Pins 76.2,66.675 r0 top locked
SW22 "MX1A-11GW" MX1A-1-LED-Pins 95.25,66.675 r0 top locked
SW23 "MX1A-11GW" MX1A-1-LED-Pins 114.3,66.675 r0 top locked
SW24 "MX1A-11GW" MX1A-1-LED-Pins 133.35,66.675 r0 top locked
SW25 "MX1A-11GW" MX1A-1-LED-Pins 152.4,66.675 r0 top locked
SW26 "MX1A-11GW" MX1A-1-LED-Pins 171.45,66.675 r0 top locked
SW27 "MX1A-11GW" MX1A-1-LED-Pins 190.5,66.675 r0 top locked
SW28 "MX1A-11GW" MX1A-1-LED-Pins 209.55,66.675 r0 top locked
SW29 "MX1A-11GW" MX1A-1-LED-Pins 228.6,66.675 r0 top locked
SW30 "MX1A-11GW" MX1A-1-LED-Pins 247.65,66.675 r0 top locked
SW31 "MX1A-11GW" MX1A-1-LED-Pins 271.462,66.675 r0 top locked
SW32 "MX1A-11GW" MX1A-1-LED-Pins 295.275,66.675 r0 top locked
SW33 "MX1A-11GW" MX1A-1-LED-Pins 11.906,47.625 r0 top locked
SW34 "MX1A-11GW" MX1A-1-LED-Pins 16.669,47.625 r0 top locked
SW35 "MX1A-11GW" MX1A-1-LED-Pins 42.863,47.625 r0 top locked
SW36 "MX1A-11GW" MX1A-1-LED-Pins 61.913,47.625 r0 top locked
SW37 "MX1A-11GW" MX1A-1-LED-Pins 80.963,47.625 r0 top locked
SW38 "MX1A-11GW" MX1A-1-LED-Pins 100.013,47.625 r0 top locked
SW39 "MX1A-11GW" MX1A-1-LED-Pins 119.063,47.625 r0 top locked
SW40 "MX1A-11GW" MX1A-1-LED-Pins 138.113,47.625 r0 top locked
SW41 "MX1A-11GW" MX1A-1-LED-Pins 157.163,47.625 r0 top locked
SW42 "MX1A-11GW" MX1A-1-LED-Pins 176.213,47.625 r0 top locked
SW43 "MX1A-11GW" MX1A-1-LED-Pins 195.263,47.625 r0 top locked
SW44 "MX1A-11GW" MX1A-1-LED-Pins 214.313,47.625 r0 top locked
SW45 "MX1A-11GW" MX1A-1-LED-Pins 233.363,47.625 r0 top locked
SW46 "MX1A-11GW" MX1A-1-LED-Pins 252.413,47.625 r0 top locked
SW47 "MX1A-11GW" MX1A-1-LED-Pins 264.319,47.625 r0 top locked
SW48 "MX1A-11GW" MX1A-1-LED-Pins 273.844,57.15 r270 top locked
SW49 "MX1A-11GW" MX1A-1-LED-Pins 295.275,47.625 r0 top locked
SW50 "MX1A-11GW" MX1A-1-LED-Pins 11.907,28.575 r0 top locked
SW51 "MX1A-11GW" MX1A-1-LED-Pins 21.432,28.575 r0 top locked
SW52 "MX1A-11GW" MX1A-1-LED-Pins 33.338,28.575 r0 top locked
SW53 "MX1A-11GW" MX1A-1-LED-Pins 52.388,28.575 r0 top locked
SW54 "MX1A-11GW" MX1A-1-LED-Pins 71.438,28.575 r0 top locked
SW55 "MX1A-11GW" MX1A-1-LED-Pins 90.488,28.575 r0 top locked
SW56 "MX1A-11GW" MX1A-1-LED-Pins 109.538,28.575 r0 top locked
SW57 "MX1A-11GW" MX1A-1-LED-Pins 128.588,28.575 r0 top locked
SW58 "MX1A-11GW" MX1A-1-LED-Pins 147.638,28.575 r0 top locked
SW59 "MX1A-11GW" MX1A-1-LED-Pins 166.688,28.575 r0 top locked
SW60 "MX1A-11GW" MX1A-1-LED-Pins 185.738,28.575 r0 top locked
SW61 "MX1A-11GW" MX1A-1-LED-Pins 204.788,28.575 r0 top locked
SW62 "MX1A-11GW" MX1A-1-LED-Pins 223.838,28.575 r0 top locked
SW63 "MX1A-11GW" MX1A-1-LED-Pins 250.032,28.575 r0 top locked
SW64 "MX1A-11GW" MX1A-1-LED-Pins 276.226,28.575 r0 top locked
SW65 "MX1A-11GW" MX1A-1-LED-Pins 295.275,28.575 r0 top locked
SW66 "MX1A-11GW" MX1A-1-LED-Pins 11.907,9.525 r0 top locked
SW67 "MX1A-11GW" "MX1A-1-reversed LED-Pins" 14.288,9.525 r0 top locked
SW68 "MX1A-11GW" MX1A-1-LED-Pins 35.719,9.525 r0 top locked
SW69 "MX1A-11GW" "MX1A-1-reversed LED-Pins" 38.1,9.525 r0 top locked
SW70 "MX1A-11GW" MX1A-1-LED-Pins 59.531,9.525 r0 top locked
SW71 "MX1A-11GW" "MX1A-1-reversed LED-Pins" 61.912,9.525 r0 top locked
SW72 "MX1A-11GW" MX1A-1-LED-Pins 130.969,9.525 r0 top locked
SW73 "MX1A-11GW" MX1A-1-LED-Pins 142.875,9.525 r0 top locked
SW74 "MX1A-11GW" MX1A-1-LED-Pins 202.407,9.525 r0 top locked
SW75 "MX1A-11GW" MX1A-1-LED-Pins 223.838,9.525 r0 top locked
SW76 "MX1A-11GW" "MX1A-1-reversed LED-Pins" 226.219,9.525 r0 top locked
SW77 "MX1A-11GW" MX1A-1-LED-Pins 257.175,9.525 r0 top locked
SW78 "MX1A-11GW" MX1A-1-LED-Pins 276.225,9.525 r0 top locked
SW79 "MX1A-11GW" MX1A-1-LED-Pins 295.275,9.525 r0 top locked
SW80 "WS-TASV 3.7x3.7mm" "SWC WS-TASV J-Bend 3.7x3.7mm" 35.5,75 r270 bottom
TP1 "TP SMD 0.6mm" "TP SMD 0.6mm" 2.5,51.3 r180 bottom
TP2 "TP SMD 0.6mm" "TP SMD 0.6mm" 2.5,43 r180 bottom
TP3 "TP SMD 0.6mm" "TP SMD 0.6mm" 286,38 r180 bottom
TP4 "TP SMD 0.6mm" "TP SMD 0.6mm" 2.5,38 r180 bottom
TP5 "TP SMD 0.6mm" "TP SMD 0.6mm" 34.725,44.7 r90 bottom
TP6 "TP SMD 0.6mm" "TP SMD 0.6mm" 24.525,48.9 r90 bottom
TP7 "TP SMD 0.6mm" "TP SMD 0.6mm" 16.5,57.721 r90 bottom
TP8 "TP SMD 0.6mm" "TP SMD 0.6mm" 17.7,56.7 r90 bottom
TP9 "TP SMD 0.6mm" "TP SMD 0.6mm" 42.7,57.4 r90 bottom
TP10 "TP SMD 0.6mm" "TP SMD 0.6mm" 85.9,65.825 r180 bottom
TP11 "TP SMD 0.6mm" "TP SMD 0.6mm" 84.95,75.225 r180 bottom
TP12 "TP SMD 0.6mm" "TP SMD 0.6mm" 83.3,72 r180 bottom
TP18 "TP SMD 0.6mm" "TP SMD 0.6mm" 29.9,70 r90 bottom
TP19 "TP SMD 0.6mm" "TP SMD 0.6mm" 29.713,40.89 r90 bottom
XC1 "16MHz 10ppm 10pF" "Crystal Oscillator SMD 3225" 21.245,62.918 r225 bottom

## Footprints (in the part's own frame and the unit in brackets; to place one, negate y for a bottom-side part, rotate by r counter-clockwise, add the part's x,y. Pads: shape width x height; smd on the part's side, far side on the other; paste and mask are expansions set on the pad)
CAPC1608X08N [mm] "Chip Capacitor, 2-Leads, Body 1,60x0,80mm, IPC Medium Density"
  rect 0.8x0.95 smd: 1(-0.815,0) 2(0.815,0)
  silkscreen extent -0.1,-0.45 0.1,0.45, body extent -0.8,-0.4 0.8,0.4, height 0.8
"Crystal Oscillator SMD 3225" [mm] "SMD 3225 (3.2mm × 2.5mm × 0.7mm)"
  rect 1.4x1.2 smd: 1(-1.1,-0.85) 2(1.1,-0.85) 3(1.1,0.85) 4(-1.1,0.85)
  silkscreen extent -2.42,-1.3 0.1,1.3, body extent -1.6,-1.25 1.6,1.25, height 1.05
"DIOC2012X06N - signal" [mm] "Chip Diode Signal, 2-Leads, Body 2,00x1,25mm, IPC Medium Density"
  rect 1x1.5 smd: 1(-0.9,0) 2(0.9,0)
  silkscreen extent -1.7,-1 -0.4,1, body extent -1.15,-0.68 1.15,0.67, height 0.76
"FID 1mm" [mm] "Fiducal 1mm"
  round 1 smd paste-1 mask+0.5: 0(0,0)
MX1A-1-LED-Pins [mm] "Cherry MX1A switch, 1-pole w/LED, w/fixation pins"
  round 2.6 hole 1.5: 1(-3.81,2.54) 2(2.54,5.08)
  round 1.8 hole 1: 3(-1.27,-5.08)
  rect 1.8x1.8 hole 1: 4(1.27,-5.08)
  round 1.7 hole 1.7 unplated: M1(-5.08,0) M1(5.08,0)
  round 4 hole 4 unplated: M1(0,0)
  body extent -7.8,-7.8 7.8,7.8, height 15.52
"MX1A-1-reversed LED-Pins" [mm] "Cherry MX1A switch, 1-pole w/LED REVERSED, w/fixation pins"
  round 2.6 hole 1.5: 1(-3.81,2.54) 2(2.54,5.08)
  round 1.8 hole 1: 3(1.27,-5.08)
  rect 1.8x1.8 hole 1: 4(-1.27,-5.08)
  round 1.7 hole 1.7 unplated: M1(-5.08,0) M1(5.08,0)
  round 4 hole 4 unplated: M1(0,0)
  body extent -7.8,-7.8 7.8,7.8, height 15.52
PTC3116X06N [mm] "PTC Fuse, 2-Leads, Body 3,10x1,60mm, IPC Medium Density"
  rect 1.3x1.7 smd: 1(-1.5,0) 2(1.5,0)
  silkscreen extent -0.45,-0.85 0.45,0.85, body extent -1.7,-0.85 1.7,0.85, height 0.8
QFN50P900X900X100_HS-65N [mm] "QFN, 64-Leads, Body 9,00x9,00mm, Pitch 0,50mm, Thermal Pad 7,50x7,50mm, IPC Medium Density"
  oval 0.8x0.25 smd: 1(-4.4,3.75) 2(-4.4,3.25) 3(-4.4,2.75) 4(-4.4,2.25) 5(-4.4,1.75) 6(-4.4,1.25) 7(-4.4,0.75) 8(-4.4,0.25) 9(-4.4,-0.25) 10(-4.4,-0.75) 11(-4.4,-1.25) 12(-4.4,-1.75) 13(-4.4,-2.25) 14(-4.4,-2.75) 15(-4.4,-3.25) 16(-4.4,-3.75) 33(4.4,-3.75) 34(4.4,-3.25) 35(4.4,-2.75) 36(4.4,-2.25) 37(4.4,-1.75) 38(4.4,-1.25) 39(4.4,-0.75) 40(4.4,-0.25) 41(4.4,0.25) 42(4.4,0.75) 43(4.4,1.25) 44(4.4,1.75) 45(4.4,2.25) 46(4.4,2.75) 47(4.4,3.25) 48(4.4,3.75)
  oval 0.25x0.8 smd: 17(-3.75,-4.4) 18(-3.25,-4.4) 19(-2.75,-4.4) 20(-2.25,-4.4) 21(-1.75,-4.4) 22(-1.25,-4.4) 23(-0.75,-4.4) 24(-0.25,-4.4) 25(0.25,-4.4) 26(0.75,-4.4) 27(1.25,-4.4) 28(1.75,-4.4) 29(2.25,-4.4) 30(2.75,-4.4) 31(3.25,-4.4) 32(3.75,-4.4) 49(3.75,4.4) 50(3.25,4.4) 51(2.75,4.4) 52(2.25,4.4) 53(1.75,4.4) 54(1.25,4.4) 55(0.75,4.4) 56(0.25,4.4) 57(-0.25,4.4) 58(-0.75,4.4) 59(-1.25,4.4) 60(-1.75,4.4) 61(-2.25,4.4) 62(-2.75,4.4) 63(-3.25,4.4) 64(-3.75,4.4)
  rect 7.5x7.5 smd: 65(0,0)
  silkscreen extent -5.42,-4.65 4.65,4.65, body extent -4.58,-4.58 4.58,4.58, height 1
RESC1608X04N [mm] "Chip Resistor, 2-Leads, Body 1,60x0,80mm, IPC Medium Density"
  rect 0.75x0.95 smd: 1(-0.825,0) 2(0.825,0)
  silkscreen extent -0.15,-0.43 0.15,0.43, body extent -0.8,-0.4 0.8,0.4, height 0.45
SM04B-SRSS-TB [mm] "SMD Header, 1mm, Side Entry, 4-pin"
  rect 1.2x1.8 smd: 0(-2.8,-1.425) 0(2.8,-1.425)
  rect 0.6x1.55 smd: 1(-1.5,2.45) 2(-0.5,2.45) 3(0.5,2.45) 4(1.5,2.45)
  silkscreen extent -3.1,-2.2 3.1,4.25, body extent -3,-2.09 3,2.86, height 2.96
SOT95P235X110-3N [mm] "SOT23, 3-Leads, Body 2,90x2,35mm, Pitch 0,95mm, IPC Medium Density"
  rect 1.1x0.8 smd: 1(-1.1,0.95) 2(-1.1,-0.95) 3(1.1,0)
  silkscreen extent -1.22,-1.5 0.7,2.02, body extent -1.3,-1.5 1.3,1.5, height 1.1
"SWC WS-TASV J-Bend 3.7x3.7mm" [mm] "WS-TASV J-Bend SMT Tact Switch 3.7x3.7 mm"
  rect 1x0.7 smd: 1(-1.55,1.4) 1(1.55,1.4) 2(-1.55,-1.4) 2(1.55,-1.4)
  silkscreen extent -2.02,-2 2,2.42, body extent -1.85,-1.85 1.85,1.85, height 0.28
TC2030-6pin-NL [mm] "6-Pin “No Legs” PCB points"
  round 0 hole 1 unplated: 0(-2.54,0) 0(2.54,-1.016) 0(2.54,1.016)
  round 0.8 smd paste-1: 1(-1.27,-0.635) 2(-1.27,0.635) 3(0,-0.635) 4(0,0.635) 5(1.27,-0.635) 6(1.27,0.635)
  Component Side pour cut-out: 3,2 -3,2 -3.5,1.5 -3.5,-1.5 -3,-2 3,-2 3.5,-1.5 3.5,1.5
  silkscreen extent -3.5,-2 3.5,2
"TITLE BLOCK A3" [mm] "Title block A3"
"TP SMD 0.6mm" [mm] "Test point, fi 0.6mm"
  round 0.6 smd paste-1: 1(0,0)
  silkscreen extent -0.6,-0.6 0.6,0.6

## Part data
C1 C7 C8 C12 C13 C14 C15 C16: library part "CAP SMD CER 10u 16V X5R 0603", "SMD CAPACITOR,10u, 16V, X5R, 0603", Capacitance=10uF, Case/Package=0603, Case Code (Metric)=1608, Dielectric=X5R, Manufacturer=Murata, Manufacturer Part Number=GRM188R61C106MA73D, Max Operating Temperature=85°C, Min Operating Temperature=-55°C, Package Quantity=4000, Supplier Part Number 1=490-7201-1-ND, Tolerance=20%, Voltage=16V, Case Code (Imperial)=0603, ComponentLink1Description=https://datasheet.ciiva.com/46444/1769893-46444981.pdf?src-supplier=Element14, ComponentLink1URL=https://datasheet.ciiva.com/46444/1769893-46444981.pdf?src-supplier=Element14, ComponentLink2Description=https://datasheet.ciiva.com/14906/partnumbering-e-01-14906479.pdf?src-supplier=Digi-Key, ComponentLink2URL=https://datasheet.ciiva.com/14906/partnumbering-e-01-14906479.pdf?src-supplier=Digi-Key, Depth=0.8mm, Height=0.8mm, Lead Free="Lead Free", Length=1.6mm, Mount="Surface Mount", Packaging="Tape and Reel", Pricing 1="1 = 0,31000, 10 = 0,21500, 50 = 0,14340, 100 = 0,12190, 500 = 0,08604, 1000 = 0,07528 (USD)", REACH SVHC="No SVHC", RoHS=Yes, RoHS Compliant=Yes, Series=GRM, Stock 1=24451, Supplier 1=Digi-Key, Thickness=0.031inch, Voltage Rating=16V, Voltage Rating (DC)=16V, Width=0.031inch
C2 C4 C5 C6 C11: library part "CAP SMD CER 100n 50V X7R 0603", "SMD CAPACITOR, 100n, 50V, X7R, 0603", Capacitance=100nF, Case/Package=0603, Case Code (Metric)=1608, Dielectric=X7R, Manufacturer=TDK, Manufacturer Part Number=CGA3E2X7R1H104K080AA, Max Operating Temperature=125°C, Min Operating Temperature=-55°C, Package Quantity=1, Ratings=AEC-Q200, Supplier Part Number 1=445-5666-1-ND, Tolerance=10%, Voltage=50V, Case Code (Imperial)=0603, ComponentLink1Description=https://datasheet.ciiva.com/24216/cga3e2x7r1h104k080aa-266291-24216208.pdf?src-supplier=Mouser, ComponentLink1URL=https://datasheet.ciiva.com/24216/cga3e2x7r1h104k080aa-266291-24216208.pdf?src-supplier=Mouser, ComponentLink2Description=https://datasheet.ciiva.com/15192/getdatasheetpartid-715867-15192412.pdf?src-supplier=Verical, ComponentLink2URL=https://datasheet.ciiva.com/15192/getdatasheetpartid-715867-15192412.pdf?src-supplier=Verical, ComponentLink3Description=https://datasheet.ciiva.com/16500/mlccspec-automotive-general-midvoltage-en-16500693.pdf?src-supplier=Future+Electronics, ComponentLink3URL=https://datasheet.ciiva.com/16500/mlccspec-automotive-general-midvoltage-en-16500693.pdf?src-supplier=Future+Electronics, ComponentLink4Description=https://datasheet.ciiva.com/22725/1735392-22725642.pdf?src-supplier=Element14, ComponentLink4URL=https://datasheet.ciiva.com/22725/1735392-22725642.pdf?src-supplier=Element14, ComponentLink5Description=https://datasheet.ciiva.com/23803/1936565-23803084.pdf?src-supplier=Newark, ComponentLink5URL=https://datasheet.ciiva.com/23803/1936565-23803084.pdf?src-supplier=Newark, ComponentLink6Description=https://datasheet.ciiva.com/46385/1735392-46385708.pdf?src-supplier=Element14, ComponentLink6URL=https://datasheet.ciiva.com/46385/1735392-46385708.pdf?src-supplier=Element14, Composition=Ceramic, Depth=0.8mm, Height=0.8mm, Lead Free="Lead Free", Length=1.6mm, Mount="Surface Mount", Packaging="Tape and Reel", Pricing 1="1 = 0,11000, 10 = 0,07900, 100 = 0,03510, 500 = 0,02510, 1000 = 0,01972 (USD)", Radiation Hardening=No, REACH SVHC="No SVHC", RoHS=Yes, Stock 1=8773520, Supplier 1=Digi-Key, Termination=SMD/SMT, Thickness=0.035inch, Voltage Rating=50V, Voltage Rating (DC)=50V, Weight=7.1E-05oz, Width=0.8mm
C3: library part "CAP SMD CER 1u 25V X7R 0603", "SMD CAPACITOR, 1µF, 25V, X7R, 0603", Capacitance=1uF, Case/Package=0603, Case Code (Metric)=1608, Dielectric=X7R, Dielectric Material=Ceramic, Manufacturer=KEMET, Manufacturer Part Number=C0603C105K3RACTU, Max Operating Temperature=125°C, Min Operating Temperature=-55°C, Package Quantity=1, Supplier Part Number 1=399-7376-1-ND, Tolerance=10%, Voltage=25V, Case Code (Imperial)=0603, ComponentLink1Description=https://datasheet.ciiva.com/7823/1851736-7823596.pdf?src-supplier=Element14, ComponentLink1URL=https://datasheet.ciiva.com/7823/1851736-7823596.pdf?src-supplier=Element14, Depth=0.8mm, Dissipation Factor=5%, Height=0.8mm, Length=1.6mm, Mount="Surface Mount", Packaging="Tape and Reel", Pricing 1="1 = 0,30000, 10 = 0,20900, 100 = 0,11830, 500 = 0,08350, 1000 = 0,07307 (USD)", REACH SVHC="No SVHC", RoHS=Yes, Stock 1=271609, Supplier 1=Digi-Key, Termination=SMD/SMT, Thickness=0.034inch, Voltage Rating=25V, Voltage Rating (DC)=25V, Width=0.031inch
C9 C10: library part "CAP SMD CER 22p 50V NP0 0603", "SMD CAPACITOR, 22p, 50V, C0G/NP0, 0603", Capacitance=22pF, Case/Package=0603, Case Code (Metric)=1608, Dielectric=C0G, Dielectric Material=Ceramic, Insulation Resistance=100GR, Manufacturer="Kyocera AVX", Manufacturer Part Number=06035A220JAT2A, Max Operating Temperature=125°C, Min Operating Temperature=-55°C, Package Quantity=1, Supplier Part Number 1=478-1167-1-ND, Temperature Coefficient=30ppm/°C, Tolerance=5%, Voltage=50V, Case Code (Imperial)=0603, ComponentLink1Description=https://datasheet.ciiva.com/11788/0900766b802d4697-11788031.pdf?src-supplier=RSComponents, ComponentLink1URL=https://datasheet.ciiva.com/11788/0900766b802d4697-11788031.pdf?src-supplier=RSComponents, ComponentLink2Description=https://datasheet.ciiva.com/16351/ccog-16351125.pdf?src-supplier=Future+Electronics, ComponentLink2URL=https://datasheet.ciiva.com/16351/ccog-16351125.pdf?src-supplier=Future+Electronics, ComponentLink3Description=https://datasheet.ciiva.com/7855/759117-7855064.pdf?src-supplier=Element14, ComponentLink3URL=https://datasheet.ciiva.com/7855/759117-7855064.pdf?src-supplier=Element14, ComponentLink4Description=https://datasheet.ciiva.com/150/ccog-150366.pdf?src-supplier=Digi-Key, ComponentLink4URL=https://datasheet.ciiva.com/150/ccog-150366.pdf?src-supplier=Digi-Key, ComponentLink5Description=https://datasheet.ciiva.com/150/ccog-150367.pdf?src-supplier=Digi-Key, ComponentLink5URL=https://datasheet.ciiva.com/150/ccog-150367.pdf?src-supplier=Digi-Key, ComponentLink6Description=https://datasheet.ciiva.com/1124/759117-1124728.pdf?src-supplier=Element14, ComponentLink6URL=https://datasheet.ciiva.com/1124/759117-1124728.pdf?src-supplier=Element14, Contact Plating=Tin,Matte, Depth=0.81mm, Height=0.63mm, Lead Free="Lead Free", Length=1.6mm, Mount="Surface Mount,PCB", Number of Pins=2, Packaging="Tape and Reel", Pricing 1="1 = 0,10000, 10 = 0,05600, 50 = 0,03040, 100 = 0,02480, 500 = 0,01772, 1000 = 0,01392 (USD)", Radiation Hardening=No, REACH SVHC="No SVHC", RoHS=Yes, RoHS Compliant=Yes, Stock 1=1291683, Supplier 1=Digi-Key, Termination=SMD/SMT, Thickness=0.035inch, Voltage Rating=50V, Voltage Rating (DC)=50V, Width=0.81mm
D1 D2 D3 D4 D5 D6 D7 D8 D9 D10 D11 D12 D13 D14 D16 D17 D18 D19 D20 D21 D22 D23 D24 D25 D26 D27 D28 D29 D30 D32 D33 D35 D36 D37 D38 D39 D40 D41 D42 D43 D44 D45 D46 D48 D49 D50 D52 D53 D54 D55 D56 D57 D58 D59 D60 D61 D62 D63 D64 D65 D66 D68 D70 D72 D74 D75 D77 D78 D79: library part "SEM SCH 40V 0.5A 0805 SD0805S040S0R5", "Schottky Diode, Small Signal, Single, 40 V, 500 mA, 480 mV, 5A max.", Average Rectified Current=500mA, Case/Package=0805, Case Code (Metric)=2012, Forward Voltage=480mV, Manufacturer="Kyocera AVX", Max Forward Surge Current (Ifsm)=5A, Max Operating Temperature=125°C, Max Repetitive Reverse Voltage (Vrrm)=40V, Max Reverse Current=100uA, Min Operating Temperature=-55°C, Package Quantity=3000, Supplier Part Number 1=478-7802-1-ND, Case Code (Imperial)=0805, ComponentLink1Description=https://datasheet.ciiva.com/46411/1796790-46411381.pdf?src-supplier=Element14, ComponentLink1URL=https://datasheet.ciiva.com/46411/1796790-46411381.pdf?src-supplier=Element14, ComponentLink2Description=https://datasheet.ciiva.com/6377/schottky-6377002.pdf?src-supplier=Digi-Key, ComponentLink2URL=https://datasheet.ciiva.com/6377/schottky-6377002.pdf?src-supplier=Digi-Key, ComponentLink3Description=https://datasheet.ciiva.com/6377/schottky-6377003.pdf?src-supplier=Digi-Key, ComponentLink3URL=https://datasheet.ciiva.com/6377/schottky-6377003.pdf?src-supplier=Digi-Key, Element Configuration=Single, Forward Current=500mA, Manufacturer Part Number=SD0805S040S0R5, Max Reverse Leakage Current=100uA, Max Reverse Voltage (DC)=40V, Max Surge Current=5A, Mount="Surface Mount", Number of Pins=2, Packaging="Tape and Reel", Peak Non-Repetitive Surge Current=5A, Pricing 1="1 = 0,47000, 10 = 0,35600, 100 = 0,22150, 500 = 0,15158, 1000 = 0,11660 (USD)", Radiation Hardening=No, REACH SVHC="No SVHC", RoHS=Yes, RoHS Compliant=Yes, Series=-, Stock 1=50780, Supplier 1=Digi-Key
F1: library part "FUS FUS 1206 15VDC 0.5A PTC 1206L050/15YR", "PTC Resettable Fuse 0.5A (hold) 1A (trip) 15VDC 100A peak 0.6W 0.1sek 0.15Ohm SMD 1206", Case/Package=1206, Case Code (Metric)=3216, Current Rating=100A, Hold Current=500mA, Manufacturer=Littelfuse, Manufacturer Part Number=1206L050/15YR, Max Operating Temperature=85°C, Max Voltage Rating (DC)=15V, Min Operating Temperature=-40°C, Package Quantity=4000, Power Dissipation=600mW, Resistance=750mR, Supplier Part Number 1=F3733CT-ND, Trip Current=1A, Approvals=cULus,TUV, Case Code (Imperial)=1206, ComponentLink1Description=https://datasheet.ciiva.com/14102/1206l-eng-datasheet-14102822.pdf?src-supplier=Distrelec, ComponentLink1URL=https://datasheet.ciiva.com/14102/1206l-eng-datasheet-14102822.pdf?src-supplier=Distrelec, ComponentLink2Description=https://datasheet.ciiva.com/16321/littelfuse-1206l-16321387.pdf?src-supplier=Future+Electronics, ComponentLink2URL=https://datasheet.ciiva.com/16321/littelfuse-1206l-16321387.pdf?src-supplier=Future+Electronics, ComponentLink3Description=https://datasheet.ciiva.com/325/littelfuse-ptc-1206l-325756.pdf?src-supplier=Digi-Key, ComponentLink3URL=https://datasheet.ciiva.com/325/littelfuse-ptc-1206l-325756.pdf?src-supplier=Digi-Key, ComponentLink4Description=https://datasheet.ciiva.com/325/littelfuse-ptc-1206l-325757.pdf?src-supplier=Digi-Key, ComponentLink4URL=https://datasheet.ciiva.com/325/littelfuse-ptc-1206l-325757.pdf?src-supplier=Digi-Key, ComponentLink5Description=https://datasheet.ciiva.com/325/littelfuse-ptc-1206l-325758.pdf?src-supplier=Digi-Key, ComponentLink5URL=https://datasheet.ciiva.com/325/littelfuse-ptc-1206l-325758.pdf?src-supplier=Digi-Key, Lead Free="Lead Free", Max Current Rating=100A, Operating Supply Voltage=15V, Packaging="Tape and Reel", Pricing 1="1 = 0,49000, 5 = 0,47200, 10 = 0,45700, 50 = 0,38480, 100 = 0,31940, 250 = 0,29040, 500 = 0,24684, 1000 = 0,21780 (USD)", RoHS=Yes, RoHS Compliant=Yes, Series="POLY-FUSE®, 1206L", Stock 1=3891, Supplier 1=Digi-Key, Termination=SMD/SMT, Time to Trip=0.1s, Voltage Rating (DC)=15V, Working Voltage=15V
FID1 FID2 FID3 FID4: library part "FID 1MM", "P&P Fiducial point, 1mm diameter"
IC1: library part "MCU AT90USB1286-MU", "MCU 8-bit AVR, 16MHz, 128KB Flash, 64-QFN 9x9mm (PS package)", Case/Package=QFN-64, Frequency=16MHz, Manufacturer="Microchip / Atmel", Max Frequency=20MHz, Max Operating Temperature=85°C, Max Supply Voltage=5.5V, Min Operating Temperature=-40°C, Min Supply Voltage=2.7V, Package Quantity=1300, Supplier Part Number 1=1278162, Address Bus Width=8b, ComponentLink1Description=https://datasheet.ciiva.com/26927/getdatasheetpartid-364802-26927386.pdf?src-supplier=Verical, ComponentLink1URL=https://datasheet.ciiva.com/26927/getdatasheetpartid-364802-26927386.pdf?src-supplier=Verical, ComponentLink2Description=https://datasheet.ciiva.com/1651/doc7593-1651388.pdf?src-supplier=Digi-Key, ComponentLink2URL=https://datasheet.ciiva.com/1651/doc7593-1651388.pdf?src-supplier=Digi-Key, ComponentLink3Description=https://datasheet.ciiva.com/14132/at90usb646-7-1286-7-eng-tds-14132493.pdf?src-supplier=Distrelec, ComponentLink3URL=https://datasheet.ciiva.com/14132/at90usb646-7-1286-7-eng-tds-14132493.pdf?src-supplier=Distrelec, Core Architecture=AVR, Data Bus Width=8b, Height=1mm, Interface=SPI,Serial,USB,USART,2-Wire,I2C,UART,EBI/EMI, Lead Free="Lead Free", Length=9mm, Manufacturer Part Number=AT90USB1286-MU, Memory Size=128KB, Memory Type=FLASH, Mount="Surface Mount", Number of ADC Channels=8, Number of I2C Channels=1, Number of I/Os=48, Number of Pins=64, Number of Programmable I/O=48, Number of PWM Channels=10, Number of SPI Channels=1, Number of Timers/Counters=4, Oscillator Type=Internal, Packaging=Tray, Peripherals="POR,PWM,WDT,Brown-out Detect/Reset", Radiation Hardening=No, RAM Size=8KB, REACH SVHC="No SVHC", RoHS=Yes, RoHS Compliant=Yes, Series=AVR®, Stock 1=0, Supplier 1=RSComponents, Watchdog Timer=Yes, Width=9mm
K1: library part "CON B2W HYB B2B SM04B-SRSS-TB", "4pin PHD 1mm SMD JST - SM04B-SRSS-TB - Pin Header, Wire-to-Board, 1 Rows, 4 Contacts, SR Series", Flammability Rating="UL94 V-0", Housing Color=Natural, Manufacturer=JST, Max Operating Temperature=85°C, Min Operating Temperature=-25°C, Supplier Part Number 1=455-1422-1-ND, Voltage Rating=50V, ComponentLink1Description=https://media.digikey.com/pdf/Data%20Sheets/JST%20PDFs/SR%20Connector.pdf?src-supplier=Digi-Key, ComponentLink1URL=https://media.digikey.com/pdf/Data%20Sheets/JST%20PDFs/SR%20Connector.pdf?src-supplier=Digi-Key, Connector Type="Header,Male Pin", Contact Material="Copper Alloy", Contact Plating=Tin,Lead, Contact Shape=Square, Fastening Type=Push,Pull, Gender=Male, Housing Material=Nylon, Insulation Color=Natural, Insulation Height=0.114inch, Insulation Material=Nylon, Lead Free="Contains Lead", Manufacturer Part Number=SM04B-SRSS-TB, Mount="Surface Mount", Number of Positions=4, Number of Rows=1, Orientation=Horizontal, Packaging="Cut Tape", REACH SVHC="No SVHC", RoHS=Yes, Stock 1=0, Supplier 1=Digi-Key, Termination=Solder
K2: library part "CON B2W HYB TC2030-ICESPI-NL-LEMTA", "TC2030-ICESPI-NL-LEMTA 6-Pin “No Legs” PCB points for 10-pin micro-connector for AVR processors. LEMTA = reversed pins. Suitable for Atmel ICE."
Q1 Q2: library part "SEM MOS N-CH 25V 680mA FDV303N", "N-Channel MOSFET, 680 mA, 25 V, SOT-23-3, ON Semiconductor FDV303N", Case/Package=SOT-23, Continuous Drain Current (ID)=680mA, Current=12A, Drain to Source Breakdown Voltage=25V, Drain to Source Resistance=450mR, Gate to Source Voltage (Vgs)=8V, Input Capacitance=50pF, Manufacturer="ON Semiconductor / Fairchild", Max Operating Temperature=150°C, Max Power Dissipation=350mW, Min Operating Temperature=-55°C, Package Quantity=1, Supplier Part Number 1=FDV303NCT-ND, Threshold Voltage=800mV, Voltage=20V, ComponentLink1Description=https://datasheet.ciiva.com/15137/getdatasheetpartid-90649-15137711.pdf?src-supplier=Verical, ComponentLink1URL=https://datasheet.ciiva.com/15137/getdatasheetpartid-90649-15137711.pdf?src-supplier=Verical, ComponentLink2Description=https://datasheet.ciiva.com/8114/fdv303n-8114704.pdf?src-supplier=Avnet, ComponentLink2URL=https://datasheet.ciiva.com/8114/fdv303n-8114704.pdf?src-supplier=Avnet, ComponentLink3Description=https://datasheet.ciiva.com/13052/fdv303n-108963-13052385.pdf?src-supplier=Mouser, ComponentLink3URL=https://datasheet.ciiva.com/13052/fdv303n-108963-13052385.pdf?src-supplier=Mouser, ComponentLink4Description=https://datasheet.ciiva.com/22681/1845307-22681736.pdf?src-supplier=Element14, ComponentLink4URL=https://datasheet.ciiva.com/22681/1845307-22681736.pdf?src-supplier=Element14, ComponentLink5Description=https://datasheet.ciiva.com/34301/871092-34301626.pdf?src-supplier=Jameco, ComponentLink5URL=https://datasheet.ciiva.com/34301/871092-34301626.pdf?src-supplier=Jameco, ComponentLink6Description=https://datasheet.ciiva.com/931/fdv303n-931809.pdf?src-supplier=Digi-Key, ComponentLink6URL=https://datasheet.ciiva.com/931/fdv303n-931809.pdf?src-supplier=Digi-Key, ComponentLink7Description=https://datasheet.ciiva.com/6037/fdv303n-6037406.pdf?src-supplier=Farnell, ComponentLink7URL=https://datasheet.ciiva.com/6037/fdv303n-6037406.pdf?src-supplier=Farnell, ComponentLink8Description=https://datasheet.ciiva.com/931/fdv303n-931810.pdf?src-supplier=Digi-Key, ComponentLink8URL=https://datasheet.ciiva.com/931/fdv303n-931810.pdf?src-supplier=Digi-Key, ComponentLink9Description=https://datasheet.ciiva.com/931/fdv303n-931811.pdf?src-supplier=Digi-Key, ComponentLink9URL=https://datasheet.ciiva.com/931/fdv303n-931811.pdf?src-supplier=Digi-Key, ComponentLink10Description=https://datasheet.ciiva.com/14092/fdv303n-eng-tds-14092037.pdf?src-supplier=Distrelec, ComponentLink10URL=https://datasheet.ciiva.com/14092/fdv303n-eng-tds-14092037.pdf?src-supplier=Distrelec, ComponentLink11Description=https://datasheet.ciiva.com/16958/fdv303n-16958487.pdf?src-supplier=Future+Electronics, ComponentLink11URL=https://datasheet.ciiva.com/16958/fdv303n-16958487.pdf?src-supplier=Future+Electronics, ComponentLink12Description=https://datasheet.ciiva.com/6037/fdv303n-6037404.pdf?src-supplier=Farnell, ComponentLink12URL=https://datasheet.ciiva.com/6037/fdv303n-6037404.pdf?src-supplier=Farnell, ComponentLink13Description=https://datasheet.ciiva.com/8114/fdv303n-8114700.pdf?src-supplier=Avnet, ComponentLink13URL=https://datasheet.ciiva.com/8114/fdv303n-8114700.pdf?src-supplier=Avnet, Contact Plating=Tin,Matte, Current Rating=680mA, Drain to Source Voltage (Vdss)=25V, Dual Supply Voltage=25V, Element Configuration=Single, Fall Time=8.5ns, Height=0.93mm, Lead Free="Lead Free", Length=2.92mm, Manufacturer Part Number=FDV303N, Mount="Surface Mount", Nominal Vgs=800mV, Number of Elements=1, Number of Pins=3, On-State Resistance=450mR, Packaging="Tape and Reel", Power Dissipation=350mW, Pricing 1="1 = 0,36000, 10 = 0,29600, 25 = 0,24760, 100 = 0,12100, 250 = 0,11908, 500 = 0,10092, 1000 = 0,07013 (USD)", Radiation Hardening=No, Rds On Max=450mR, REACH SVHC="No SVHC", Rise Time=8.5ns, RoHS=Yes, Stock 1=569121, Supplier 1=Digi-Key, Termination=SMD/SMT, Turn-Off Delay Time=17ns, Turn-On Delay Time=3ns, Voltage Rating (DC)=25V, Width=3.05mm